# Altium PCB Thunderscope_Rev5.3.PcbDoc (part 7 of 14)
Units mil, origin at the board's own origin, x right, y up, seen from the top; angles counter-clockwise.
Board outline 3937.01 x 3838.58 mil, 6 copper layers (F.Cu, In1.Cu (GND), In2.Cu (Sign), In3.Cu (Sign), In4.Cu (GND), B.Cu), stack 60.556 mil thick; 911 components, 486 nets, 2834 pads, 2761 vias.
Unrouted connection lines stored in the file: 618.
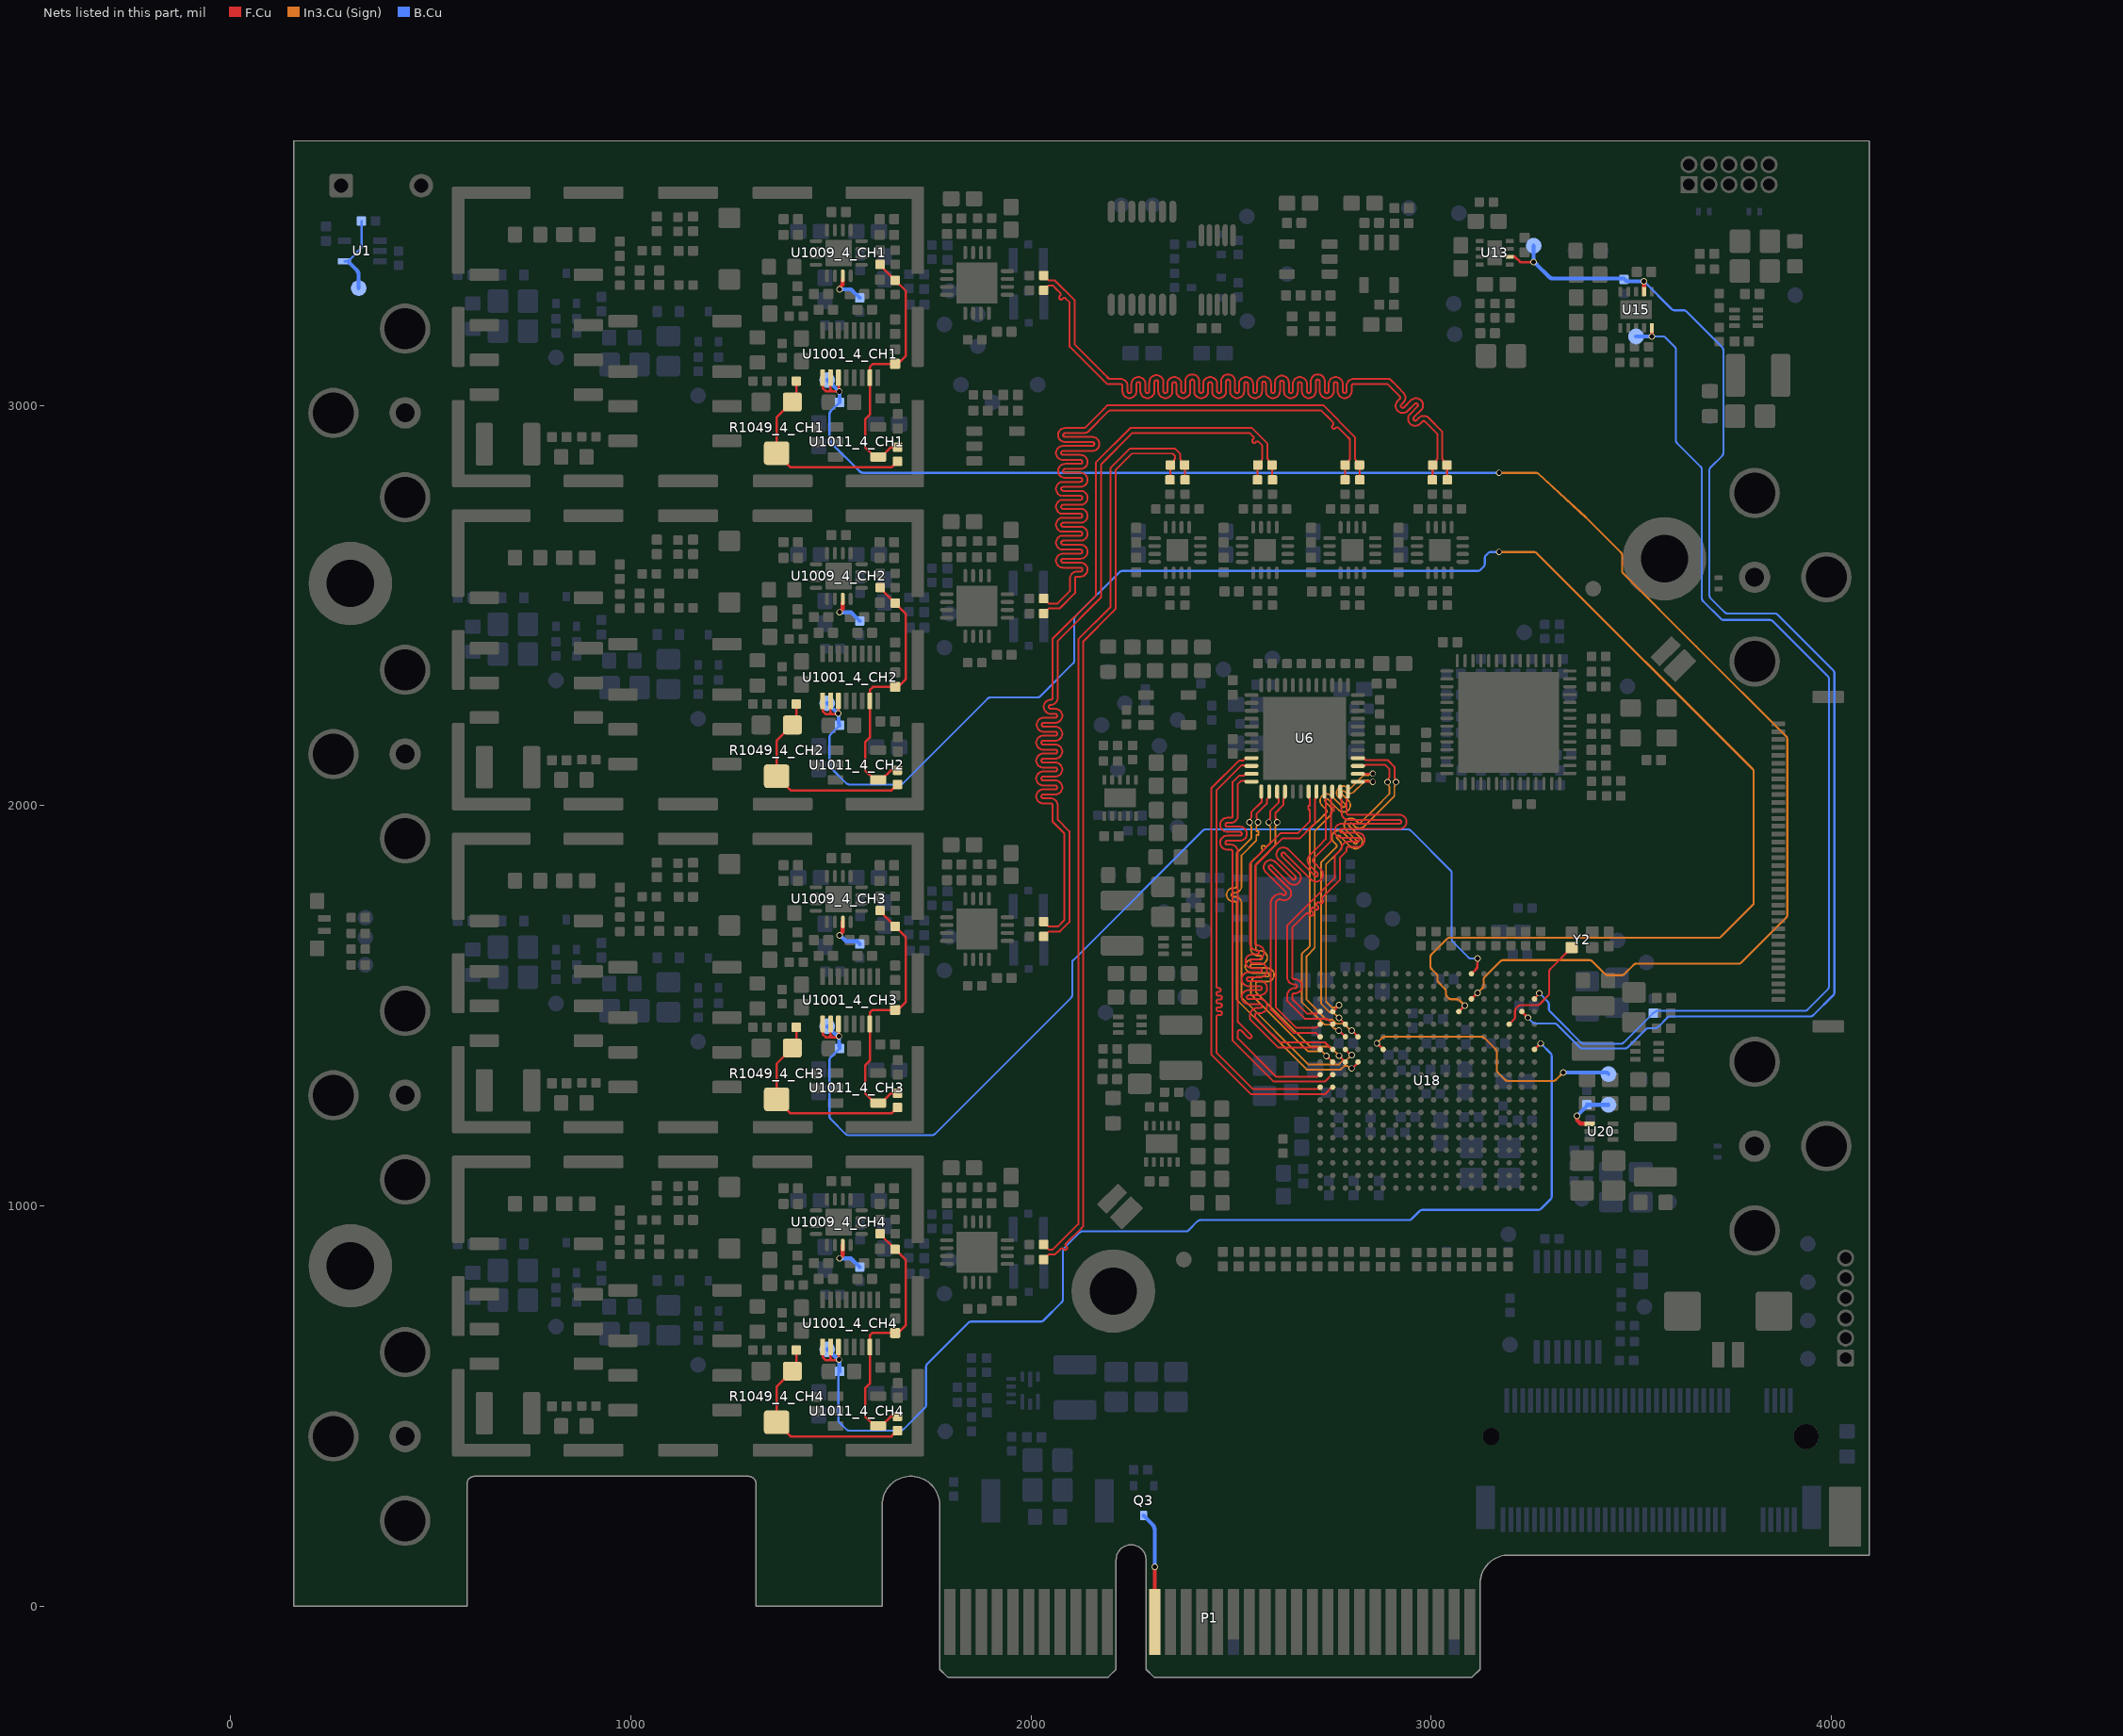
[diagram p10: the nets of this part, all layers, seen from the top]

## Via types
v1: diameter 16, hole 11.81, F.Cu to B.Cu, tented both sides, 2761 vias

## Nets (pads, with @x,y where several pads share a name; then routed paths per layer and width w, separated by ;. In a path a pad name is that pad's centre, name@x,y a point inside that pad or via, vN(x,y) a via of type N, cw(c..) or ccw(c..) an arc to the next point about the centre after c; other vN are vias at no path point) (continued)
BUF_R_BIAS_CH1: R1036_4_CH1.1 U1009_4_CH1.7 | length 85.2
  F.Cu w10: v1(1521.59,3290.42) 1522.73,3291.57 1522.73,3295.87 1529.53,3302.66 U1009_4_CH1.7@1529.53,3313.07
  B.Cu w10: v1(1521.59,3290.42) 1550.13,3290.42 R1036_4_CH1.1@1571.85,3268.7
BUF_R_BIAS_CH2: R1036_4_CH2.1 U1009_4_CH2.7 | length 85.2
  F.Cu w10: v1(1521.59,2483.34) 1521.59,2484.31 1529.47,2492.19 U1009_4_CH2.7@1529.47,2505.98
  B.Cu w10: v1(1521.59,2483.34) 1550.13,2483.34 R1036_4_CH2.1@1571.85,2461.61
BUF_R_BIAS_CH3: R1036_4_CH3.1 U1009_4_CH3.7 | length 95.9
  F.Cu w10: v1(1521.59,1676.25) 1521.59,1677.17 1529.53,1685.11 U1009_4_CH3.7@1529.53,1709.65
  B.Cu w10: v1(1521.59,1676.25) 1523.21,1676.25 1538.12,1661.34 1565.04,1661.34 R1036_4_CH3.1@1571.85,1654.53
BUF_R_BIAS_CH4: R1036_4_CH4.1 U1009_4_CH4.7 | length 95.9
  F.Cu w10: v1(1521.59,869.16) 1529.53,877.1 U1009_4_CH4.7@1529.53,902.56
  B.Cu w10: v1(1521.59,869.16) 1550.13,869.16 R1036_4_CH4.1@1571.85,847.44
CH1_N: "R131_4_ADC Driver 1.1" "R133_4_ADC Driver 1.1" R97_4_CH1.2 | length 2300.6
  F.Cu w4.7: R97_4_CH1.2@2031.5,3287.4 2031.82,3287.4 2044.17,3299.75 2054.25,3299.75 2064.36,3289.64 2072.88,3281.12 cw(c2069.45,3277.69) 2072.88,3274.26 2071.56,3272.94 ccw(c2074.99,3269.51) 2071.56,3266.08 ccw(c2074.99,3269.51) 2078.42,3266.08 2079.74,3267.4 cw(c2083.17,3263.97) 2086.6,3267.4 2096.54,3257.46 2096.54,3253.51 2096.54,3146.91 2181.3,3062.15 2189.74,3053.7 2223.6,3053.7 cw(c2223.6,3048.86) 2228.45,3048.86 2228.45,3035.89 ccw(c2246,3035.89) 2246,3018.34 ccw(c2246,3035.89) 2263.55,3035.89 2263.55,3053.71 cw(c2268.4,3053.71) 2268.4,3058.56 cw(c2268.4,3053.71) 2273.25,3053.71 2273.25,3035.89 ccw(c2290.8,3035.89) 2290.8,3018.34 ccw(c2290.8,3035.89) 2308.35,3035.89 2308.35,3058.34 cw(c2313.2,3058.34) 2313.2,3063.19 cw(c2313.2,3058.34) 2318.05,3058.34 2318.05,3035.89 ccw(c2335.6,3035.89) 2335.6,3018.34 ccw(c2335.6,3035.89) 2353.15,3035.89 2353.15,3053.71 cw(c2358,3053.71) 2358,3058.56 cw(c2358,3053.71) 2362.85,3053.71 2362.85,3035.89 ccw(c2380.4,3035.89) 2380.4,3018.34 ccw(c2380.4,3035.89) 2397.95,3035.89 2397.95,3060.04 cw(c2402.8,3060.04) 2402.8,3064.89 cw(c2402.8,3060.04) 2407.65,3060.04 2407.65,3035.89 ccw(c2425.2,3035.89) 2425.2,3018.34 ccw(c2425.2,3035.89) 2442.75,3035.89 2442.75,3053.71 cw(c2447.6,3053.71) 2447.6,3058.56 cw(c2447.6,3053.71) 2452.45,3053.71 2452.45,3035.89 ccw(c2470,3035.89) 2470,3018.34 ccw(c2470,3035.89) 2487.55,3035.89 2487.55,3060.04 cw(c2492.4,3060.04) 2492.4,3064.89 cw(c2492.4,3060.04) 2497.25,3060.04 2497.25,3035.89 ccw(c2514.8,3035.89) 2514.8,3018.34 ccw(c2514.8,3035.89) 2532.35,3035.89 2532.35,3053.71 cw(c2537.2,3053.71) 2537.2,3058.56 cw(c2537.2,3053.71) 2542.05,3053.71 2542.05,3035.89 ccw(c2559.6,3035.89) 2559.6,3018.34 ccw(c2559.6,3035.89) 2577.15,3035.89 2577.15,3054.88 cw(c2582,3054.88) 2582,3059.73 cw(c2582,3054.88) 2586.85,3054.88 2586.85,3035.89 ccw(c2604.4,3035.89) 2604.4,3018.34 ccw(c2604.4,3035.89) 2621.95,3035.89 2621.95,3056.98 cw(c2626.8,3056.98) 2626.8,3061.83 cw(c2626.8,3056.98) 2631.65,3056.98 2631.65,3035.89 ccw(c2649.2,3035.89) 2649.2,3018.34 ccw(c2649.2,3035.89) 2666.75,3035.89 2666.75,3053.71 cw(c2671.6,3053.71) 2671.6,3058.56 cw(c2671.6,3053.71) 2676.45,3053.71 2676.45,3035.89 ccw(c2694,3035.89) 2694,3018.34 ccw(c2694,3035.89) 2711.55,3035.89 2711.55,3060.04 cw(c2716.4,3060.04) 2716.4,3064.89 cw(c2716.4,3060.04) 2721.25,3060.04 2721.25,3035.89 ccw(c2738.8,3035.89) 2738.8,3018.34 ccw(c2738.8,3035.89) 2756.35,3035.89 2756.35,3053.71 cw(c2761.2,3053.71) 2761.2,3058.56 cw(c2761.2,3053.71) 2766.05,3053.71 2766.05,3035.89 ccw(c2783.6,3035.89) 2783.6,3018.34 ccw(c2783.6,3035.89) 2801.15,3035.89 2801.15,3048.86 cw(c2805.99,3048.86) 2805.99,3053.7 2847.72,3053.7 2890.61,3053.7 2906.66,3037.66 2921.19,3023.13 ; 2921.2,3023.11 cw(c2917.79,3019.66) 2921.22,3016.23 2916.22,3011.24 ccw(c2928.63,2998.83) 2916.22,2986.42 ccw(c2928.63,2998.83) 2941.04,2986.42 2958.58,3003.95 cw(c2962.01,3000.52) 2965.44,3003.95 cw(c2962.01,3000.52) 2965.46,2997.12 2947.43,2979.08 ccw(c2959.84,2966.67) 2947.43,2954.26 ccw(c2959.84,2966.67) 2972.26,2954.28 2977.72,2959.74 cw(c2981.15,2956.31) 2984.6,2959.72 3015.18,2929.14 3015.18,2898.84 3015.18,2866.35 3012.9,2864.07 3012.9,2860.47 3003.81,2851.38 3003.32,2850.89
  F.Cu w5: 3002.83,2813.98 3003.32,2814.47 3003.32,2850.89
CH1_P: "R131_4_ADC Driver 1.2" "R132_4_ADC Driver 1.1" R52_4_CH1.2 | length 2307.2
  F.Cu w4.7: R52_4_CH1.2@2031.5,3324.8 2031.82,3324.8 2044.17,3312.45 2059.51,3312.45 2109.24,3262.72 2109.24,3152.17 2181.47,3079.94 2195,3066.4 2223.6,3066.4 cw(c2223.6,3048.86) 2241.15,3048.86 2241.15,3035.89 ccw(c2246,3035.89) 2246,3031.04 ccw(c2246,3035.89) 2250.85,3035.89 2250.85,3053.71 cw(c2268.4,3053.71) 2268.4,3071.26 cw(c2268.4,3053.71) 2285.95,3053.71 2285.95,3035.89 ccw(c2290.8,3035.89) 2290.8,3031.04 ccw(c2290.8,3035.89) 2295.65,3035.89 2295.65,3058.34 cw(c2313.2,3058.34) 2313.2,3075.89 cw(c2313.2,3058.34) 2330.75,3058.34 2330.75,3035.89 ccw(c2335.6,3035.89) 2335.6,3031.04 ccw(c2335.6,3035.89) 2340.45,3035.89 2340.45,3053.71 cw(c2358,3053.71) 2358,3071.26 cw(c2358,3053.71) 2375.55,3053.71 2375.55,3035.89 ccw(c2380.4,3035.89) 2380.4,3031.04 ccw(c2380.4,3035.89) 2385.25,3035.89 2385.25,3060.04 cw(c2402.8,3060.04) 2402.8,3077.59 cw(c2402.8,3060.04) 2420.35,3060.04 2420.35,3035.89 ccw(c2425.2,3035.89) 2425.2,3031.04 ccw(c2425.2,3035.89) 2430.05,3035.89 2430.05,3053.71 cw(c2447.6,3053.71) 2447.6,3071.26 cw(c2447.6,3053.71) 2465.15,3053.71 2465.15,3035.89 ccw(c2470,3035.89) 2470,3031.04 ccw(c2470,3035.89) 2474.85,3035.89 2474.85,3060.04 cw(c2492.4,3060.04) 2492.4,3077.59 cw(c2492.4,3060.04) 2509.95,3060.04 2509.95,3035.89 ccw(c2514.8,3035.89) 2514.8,3031.04 ccw(c2514.8,3035.89) 2519.65,3035.89 2519.65,3053.71 cw(c2537.2,3053.71) 2537.2,3071.26 cw(c2537.2,3053.71) 2554.75,3053.71 2554.75,3035.89 ccw(c2559.6,3035.89) 2559.6,3031.04 ccw(c2559.6,3035.89) 2564.45,3035.89 2564.45,3054.88 cw(c2582,3054.88) 2582,3072.43 cw(c2582,3054.88) 2599.55,3054.88 2599.55,3035.89 ccw(c2604.4,3035.89) 2604.4,3031.04 ccw(c2604.4,3035.89) 2609.25,3035.89 2609.25,3056.98 cw(c2626.8,3056.98) 2626.8,3074.53 cw(c2626.8,3056.98) 2644.35,3056.98 2644.35,3035.89 ccw(c2649.2,3035.89) 2649.2,3031.04 ccw(c2649.2,3035.89) 2654.05,3035.89 2654.05,3053.71 cw(c2671.6,3053.71) 2671.6,3071.26 cw(c2671.6,3053.71) 2689.15,3053.71 2689.15,3035.89 ccw(c2694,3035.89) 2694,3031.04 ccw(c2694,3035.89) 2698.85,3035.89 2698.85,3060.04 cw(c2716.4,3060.04) 2716.4,3077.59 cw(c2716.4,3060.04) 2733.95,3060.04 2733.95,3035.89 ccw(c2738.8,3035.89) 2738.8,3031.04 ccw(c2738.8,3035.89) 2743.65,3035.89 2743.65,3053.71 cw(c2761.2,3053.71) 2761.2,3071.26 cw(c2761.2,3053.71) 2778.75,3053.71 2778.75,3035.89 ccw(c2783.6,3035.89) 2783.6,3031.04 ccw(c2783.6,3035.89) 2788.45,3035.89 2788.45,3048.86 cw(c2805.99,3048.86) 2805.99,3066.4 2847.72,3066.4 2895.87,3066.4 2915.64,3046.64 2930.2,3032.07 ; 2930.22,3032.05 2932.06,3030.21 2932.06,3029.88 cw(c2917.79,3019.66) 2930.2,3007.25 2925.2,3002.26 ccw(c2928.63,2998.83) 2925.2,2995.4 ccw(c2928.63,2998.83) 2932.06,2995.4 2949.6,3012.93 cw(c2962.01,3000.52) 2974.42,3012.93 cw(c2962.01,3000.52) 2974.4,2988.1 ; 2974.38,2988.08 2956.41,2970.1 ccw(c2959.84,2966.67) 2956.41,2963.24 ccw(c2959.84,2966.67) 2963.24,2963.22 2968.74,2968.72 cw(c2981.15,2956.31) 2991.36,2970.58 2991.7,2970.58 2993.53,2968.74 ; 2993.56,2968.72 3027.88,2934.4 3027.88,2911.54 3027.88,2866.35 3030.16,2864.07 3030.16,2860.05 3030.31,2859.9
  F.Cu w5: 3030.39,2859.98 3039,2851.38 3039.24,2851.38 3039.74,2850.89 3039.74,2814.47 3040.23,2813.98
CH2_N: "R131_4_ADC Driver 2.1" "R133_4_ADC Driver 2.1" R97_4_CH2.2 | length 2300.2
  F.Cu w4.7: R97_4_CH2.2@2031.5,2480.32 2031.82,2480.32 2044.17,2492.67 2071.41,2492.67 2109.87,2531.13 2109.87,2533.76 2109.87,2567.65 cw(c2114.72,2567.65) 2114.72,2572.5 2123.34,2572.5 ccw(c2123.34,2590.05) 2123.34,2607.6 2079.92,2607.6 cw(c2079.92,2612.45) 2079.92,2617.3 2123.65,2617.3 ccw(c2123.65,2634.85) 2123.65,2652.4 2079.92,2652.4 cw(c2079.92,2657.25) 2079.92,2662.1 2123.65,2662.1 ccw(c2123.65,2679.65) 2123.65,2697.2 2079.92,2697.2 cw(c2079.92,2702.05) 2079.92,2706.9 2123.65,2706.9 ccw(c2123.65,2724.45) 2123.65,2742 2079.92,2742 cw(c2079.92,2746.85) 2079.92,2751.7 2123.65,2751.7 ccw(c2123.65,2769.25) 2123.65,2786.8 2079.92,2786.8 cw(c2079.92,2791.65) 2079.92,2796.5 2123.65,2796.5 ccw(c2123.65,2814.05) 2123.65,2831.6 2085.07,2831.6 cw(c2085.07,2836.45) 2085.07,2841.3 2123.65,2841.3 ccw(c2123.65,2858.85) 2123.65,2876.4 2079.92,2876.4 cw(c2079.92,2881.25) 2079.92,2886.1 2153.26,2886.1 ccw(c2153.26,2903.65) 2153.26,2921.2 2085.07,2921.2 cw(c2085.07,2926.05) 2085.07,2930.9 2132,2930.9 ccw(c2132,2948.45) 2144.41,2936.04 2193.75,2985.38 2193.79,2985.42 2193.79,2985.47 2196.35,2988.03 2196.35,2988.08 ; 2784.81,2850.89 2785.3,2851.38 2794.39,2860.47 2794.39,2864.07 2796.67,2866.35 2796.67,2915.79 2785.96,2926.51 2768.21,2944.25 ccw(c2764.78,2940.82) 2761.35,2944.25 2760.27,2943.17 cw(c2756.84,2946.6) 2753.41,2943.17 cw(c2756.84,2946.6) 2753.41,2950.03 2754.5,2951.11 ccw(c2751.07,2954.54) 2754.5,2957.97 2745.97,2966.49 2724.35,2988.12 2198.77,2988.12 2196.38,2988.12 ; 2196.35,2988.08 2196.38,2988.12
  F.Cu w5: 2784.32,2813.98 2784.81,2814.47 2784.81,2850.89
CH2_P: "R131_4_ADC Driver 2.2" "R132_4_ADC Driver 2.1" R52_4_CH2.2 | length 2306.8
  F.Cu w4.7: R52_4_CH2.2@2031.5,2517.72 2031.82,2517.72 2044.17,2505.37 2066.15,2505.37 2094.54,2533.76 2097.17,2536.39 2097.17,2567.65 cw(c2114.72,2567.65) 2114.72,2585.2 2123.34,2585.2 ccw(c2123.34,2590.05) 2123.34,2594.9 2079.92,2594.9 cw(c2079.92,2612.45) 2079.92,2630 2123.65,2630 ccw(c2123.65,2634.85) 2123.65,2639.7 2079.92,2639.7 cw(c2079.92,2657.25) 2079.92,2674.8 2123.65,2674.8 ccw(c2123.65,2679.65) 2123.65,2684.5 2079.92,2684.5 cw(c2079.92,2702.05) 2079.92,2719.6 2123.65,2719.6 ccw(c2123.65,2724.45) 2123.65,2729.3 2079.92,2729.3 cw(c2079.92,2746.85) 2079.92,2764.4 2123.65,2764.4 ccw(c2123.65,2769.25) 2123.65,2774.1 2079.92,2774.1 cw(c2079.92,2791.65) 2079.92,2809.2 2123.65,2809.2 ccw(c2123.65,2814.05) 2123.65,2818.9 2085.07,2818.9 cw(c2085.07,2836.45) 2085.07,2854 2123.65,2854 ccw(c2123.65,2858.85) 2123.65,2863.7 2079.92,2863.7 cw(c2079.92,2881.25) 2079.92,2898.8 2153.26,2898.8 ccw(c2153.26,2903.65) 2153.26,2908.5 2085.07,2908.5 cw(c2085.07,2926.05) 2085.07,2943.6 2132,2943.6 ccw(c2132,2948.45) 2135.43,2945.02 2181.05,2990.64 2181.09,2990.68 2181.09,2990.73 ; 2181.05,2990.75 2191.12,3000.82 2729.61,3000.82 2809.37,2921.05 2809.37,2866.35 2811.65,2864.07 2811.65,2860.05 2811.8,2859.9
  F.Cu w5: 2811.89,2859.98 2820.49,2851.38 2820.74,2851.38 2821.23,2850.89 2821.23,2814.47 2821.72,2813.98
CH3_N: "R131_4_ADC Driver 3.1" "R133_4_ADC Driver 3.1" R97_4_CH3.2 | length 2283.9
  F.Cu w4.7: R97_4_CH3.2@2031.5,1673.23 2031.82,1673.23 2044.17,1685.58 2072.12,1685.58 2095.88,1709.34 2095.88,1935.91 2066.79,1965 2066.79,1992.13 2066.79,2000.83 ccw(c2049.24,2000.83) 2049.24,2018.38 2030.59,2018.38 cw(c2030.59,2023.23) 2030.59,2028.08 2060.51,2028.08 ccw(c2060.51,2045.63) 2060.51,2063.18 2030.59,2063.18 cw(c2030.59,2068.03) 2030.59,2072.88 2060.51,2072.88 ccw(c2060.51,2090.43) 2060.51,2107.98 2030.59,2107.98 cw(c2030.59,2112.83) 2030.59,2117.68 2060.51,2117.68 ccw(c2060.51,2135.23) 2060.51,2152.78 2030.59,2152.78 cw(c2030.59,2157.63) 2030.59,2162.48 2060.51,2162.48 ccw(c2060.51,2180.03) 2060.51,2197.58 2031.7,2197.58 cw(c2031.7,2202.43) 2031.7,2207.28 2060.44,2207.28 ccw(c2060.44,2224.83) 2060.44,2242.38 2049.24,2242.38 cw(c2049.24,2247.23) 2049.24,2252.08 ccw(c2049.24,2269.63) 2066.79,2269.63 2066.79,2317.1 2066.79,2412.47 2175.02,2520.7 2175.02,2852.92 2253.3,2931.2 2546.6,2931.2 2555.13,2922.68 cw(c2551.7,2919.25) 2555.13,2915.82 2553.94,2914.63 ccw(c2557.37,2911.2) 2553.94,2907.77 ccw(c2557.37,2911.2) 2560.8,2907.77 2561.98,2908.96 cw(c2565.41,2905.53) 2568.84,2908.96 2578.16,2899.64 2578.16,2866.35 2575.89,2864.07 2575.89,2860.47 2566.8,2851.38 2566.31,2850.89
  F.Cu w5: 2565.81,2813.98 2566.31,2814.47 2566.31,2850.89
CH3_P: "R131_4_ADC Driver 3.2" "R132_4_ADC Driver 3.1" R52_4_CH3.2 | length 2290.5
  F.Cu w4.7: R52_4_CH3.2@2031.5,1710.63 2031.82,1710.63 2044.17,1698.28 2066.86,1698.28 2083.18,1714.6 2083.18,1930.65 2054.09,1959.74 2054.09,1992.13 2054.09,2000.83 ccw(c2049.24,2000.83) 2049.24,2005.68 2030.59,2005.68 cw(c2030.59,2023.23) 2030.59,2040.78 2060.51,2040.78 ccw(c2060.51,2045.63) 2060.51,2050.48 2030.59,2050.48 cw(c2030.59,2068.03) 2030.59,2085.58 2060.51,2085.58 ccw(c2060.51,2090.43) 2060.51,2095.28 2030.59,2095.28 cw(c2030.59,2112.83) 2030.59,2130.38 2060.51,2130.38 ccw(c2060.51,2135.23) 2060.51,2140.08 2030.59,2140.08 cw(c2030.59,2157.63) 2030.59,2175.18 2060.51,2175.18 ccw(c2060.51,2180.03) 2060.51,2184.88 2031.7,2184.88 cw(c2031.7,2202.43) 2031.7,2219.98 2060.44,2219.98 ccw(c2060.44,2224.83) 2060.44,2229.68 2049.24,2229.68 cw(c2049.24,2247.23) 2049.24,2264.78 ccw(c2049.24,2269.63) 2054.09,2269.63 2054.09,2317.1 2054.09,2417.73 2162.32,2525.96 2162.32,2858.18 2248.04,2943.9 2551.87,2943.9 2590.86,2904.9 2590.86,2866.35 2593.14,2864.07 2593.14,2860.47 2602.23,2851.38
  F.Cu w5: 2602.23,2851.38 2602.72,2850.89 2602.72,2814.47 2603.21,2813.98
CH4_N: "R131_4_ADC Driver 4.1" "R133_4_ADC Driver 4.1" R97_4_CH4.2 | length 2303.9
  F.Cu w4.7: R97_4_CH4.2@2031.5,866.14 2031.82,866.14 2044.17,878.49 2059.56,878.49 2065.25,884.18 2066.91,885.84 2073.77,892.7 cw(c2077.2,889.27) 2080.63,892.7 2081.82,891.51 ccw(c2085.25,894.94) 2088.68,891.51 ccw(c2085.25,894.94) 2088.68,898.37 2087.49,899.56 cw(c2090.92,902.99) 2087.49,906.42 2125.71,944.64 2127.37,946.3 2130.65,949.58 2130.65,2410.66 2203.98,2483.98 2211.42,2491.42 2211.42,2839.06 2252.21,2879.85 2353.94,2879.85 2359.66,2874.13 2359.66,2866.35 2357.38,2864.07 2357.38,2860.47 2348.29,2851.38
  F.Cu w5: 2347.31,2813.98 2347.8,2814.47 2347.8,2850.89 2348.29,2851.38
CH4_P: "R131_4_ADC Driver 4.2" "R132_4_ADC Driver 4.1" R52_4_CH4.2 | length 2310.5
  F.Cu w4.7: R52_4_CH4.2@2031.5,903.54 2031.82,903.54 2044.17,891.19 2054.3,891.19 2117.95,954.84 2117.95,2415.92 2198.72,2496.68 2198.72,2844.32 2246.94,2892.55 2359.2,2892.55 2372.36,2879.39 2372.36,2866.35 2374.64,2864.07 2374.64,2860.47 2383.72,2851.38
  F.Cu w5: 2383.72,2851.38 2384.22,2850.89 2384.22,2814.47 2384.71,2813.98
CLK25: U18.T14 Y2.3 | length 282.3
  F.Cu w5: U18.T14@3194.94,1454.1 3206.45,1465.61 ccw(c3199.37,1472.67) 3209.37,1472.67 3209.37,1487.43 cw(c3219.37,1487.43) 3212.3,1494.5 3216.3,1498.5 cw(c3223.38,1491.44) 3223.38,1501.44 3263.89,1501.44 ccw(c3263.89,1511.44) 3270.94,1504.35 3291.84,1525.25 ccw(c3284.75,1532.3) 3294.75,1532.3 3294.75,1585.13 cw(c3304.75,1585.13) 3297.66,1592.18 Y2.3@3351.15,1645.67
CLKREQ#: P1.B12 Q3.1 | length 276.3
  F.Cu w10: P1.B12@2309.06,-39.37 v1(2309.06,98.43)
  B.Cu w10: Q3.1@2281.5,226.38 2285.75,222.13 2303.23,204.64 cw(c2289.06,190.53) 2309.06,190.53 v1(2309.06,98.43)
COMP: R7.2 TP61.1 U1.4 | length 199.7
  B.Cu w6: U1.4@284.45,3360.24 288.39,3360.24 293.31,3360.24 323.28,3390.21 ccw(c314.77,3398.67) 326.77,3398.67 R7.2@326.77,3460.63
  B.Cu w10: U1.4@293.31,3360.24 296.18,3357.36 314.02,3339.52 cw(c299.88,3325.38) 319.88,3325.38 TP61.1@319.88,3293.31
D1A_N: U6.10 U18.A9 | length 1142
  F.Cu w4.7: U6.10@2550.91,2099.41 2549.92,2100.39 2533.49,2100.39 2533.21,2100.68 2525.42,2100.68 2462.94,2038.2 2462.94,1579.84 2462.94,1549.65 ccw(c2467.79,1549.65) 2467.79,1544.8 2469.08,1544.8 cw(c2469.08,1539.95) 2469.08,1535.1 2467.79,1535.1 ccw(c2467.79,1530.25) 2467.79,1525.4 2472.26,1525.4 cw(c2472.26,1520.55) 2472.26,1515.7 2467.79,1515.7 ccw(c2467.79,1510.85) 2467.79,1506 2472.26,1506 cw(c2472.26,1501.15) 2472.26,1496.3 2467.79,1496.3 ccw(c2467.79,1491.45) 2467.79,1486.6 2472.26,1486.6 cw(c2472.26,1481.75) 2472.26,1476.9 2467.79,1476.9 ccw(c2467.79,1472.05) 2462.94,1472.05 2462.94,1460 2462.94,1383.8 2554.82,1291.92 2715.15,1291.92 2719.98,1296.75 U18.A9@2722.44,1296.75
D1A_P: U6.9 U18.B9 | length 1149
  F.Cu w4.7: U6.9@2550.91,2119.09 2536.72,2119.09 2531,2113.38 2520.16,2113.38 2450.24,2043.46 2450.24,1378.54 2549.56,1279.22 2734.25,1279.22 2751.79,1296.75 U18.B9@2753.94,1296.75
D1B_N: U6.12 U18.A10 | length 1126.9
  F.Cu w4.7: U6.12@2550.91,2060.04 2549.92,2061.02 2533.49,2061.02 2532.48,2062.04 2524.69,2062.04 2516.75,2054.09 2516.75,2005.92 2516.75,1974.82 cw(c2499.2,1974.82) 2499.2,1957.27 2490.19,1957.27 ccw(c2490.19,1952.42) 2490.19,1947.57 2521.83,1947.57 cw(c2521.83,1930.02) 2521.83,1912.47 2490.19,1912.47 ccw(c2490.19,1907.62) 2490.19,1902.77 2499.2,1902.77 cw(c2499.2,1885.22) 2516.75,1885.22 2516.75,1775.81 2516.75,1478.25 2516.75,1462.23 ccw(c2521.6,1462.23) 2518.17,1458.8 2549.91,1427.06 cw(c2546.48,1423.63) 2549.91,1420.2 cw(c2546.48,1423.63) 2543.05,1420.2 2525.03,1438.22 ccw(c2521.6,1434.8) 2516.75,1434.8 2516.75,1426.03 2516.75,1418.4 2611.73,1323.42 2715.15,1323.42 2719.98,1328.25 U18.A10@2722.44,1328.25
D1B_P: U6.11 U18.B10 | length 1133.5
  F.Cu w4.7: U6.11@2550.91,2079.72 2536.72,2079.72 2531.73,2074.74 2519.43,2074.74 2504.05,2059.35 2504.05,2005.92 2504.05,1974.82 cw(c2499.2,1974.82) 2499.2,1969.97 2490.19,1969.97 ccw(c2490.19,1952.42) 2490.19,1934.87 2521.83,1934.87 cw(c2521.83,1930.02) 2521.83,1925.17 2490.19,1925.17 ccw(c2490.19,1907.62) 2490.19,1890.07 2499.2,1890.07 cw(c2499.2,1885.22) 2504.05,1885.22 2504.05,1775.81 2504.05,1413.14 2606.47,1310.72 2734.25,1310.72 2751.79,1328.25 U18.B10@2753.94,1328.25
D2A_N: U6.14 U18.C12 | length 965.5
  F.Cu w4.7: v1(2567.2,1958.86) 2565.04,1961.02 2565.04,1967.96 2562.99,1970.02 2562.99,1978.75 2589.2,2004.97 2589.2,2015.25 2595.2,2021.25 U6.14@2595.2,2035.43
  F.Cu w5: U18.C12@2785.49,1391.1 2785.49,1390.61 2799.27,1376.83 v1(2801.24,1376.83)
  In3.Cu (Sign) w4.3: v1(2567.2,1958.86) 2564.96,1956.62 2564.96,1950.15 2562.79,1947.97 2562.79,1936.48 2568.05,1936.48 2568.05,1927.18 2562.79,1927.18 2562.79,1915.73 2562.79,1912.93 2525.91,1876.05 2525.91,1829.08 2525.91,1799.18 cw(c2508.96,1799.18) 2508.96,1782.23 2505.42,1782.23 ccw(c2505.42,1777.58) 2505.42,1772.93 2508.96,1772.93 cw(c2508.96,1755.98) 2525.91,1755.98 2525.91,1698.59 2525.91,1521.03 2693.76,1353.17 2768.88,1353.17 2777.74,1362.03 2786.03,1362.03 2800.83,1376.83 v1(2801.24,1376.83)
D2A_P: U6.13 U18.D11 | length 967.2
  F.Cu w4.7: v1(2546.07,1958.86) 2548.24,1961.02 2548.24,1967.96 2550.29,1970.02 2550.29,1984.01 2576.5,2010.23 2576.5,2018.01 2576.5,2034.45 U6.13@2575.51,2035.43
  F.Cu w5: v1@2803.99,1345.14 2816.99,1358.13 U18.D11@2816.99,1359.61
  In3.Cu (Sign) w4.3: v1(2546.07,1958.86) 2548.31,1956.62 2548.31,1950.15 2550.49,1947.97 2550.49,1918.03 2513.61,1881.14 2513.61,1829.08 2513.61,1799.18 cw(c2508.96,1799.18) 2508.96,1794.53 2505.42,1794.53 ccw(c2505.42,1777.58) 2505.42,1760.63 2508.96,1760.63 cw(c2508.96,1755.98) 2513.61,1755.98 2513.61,1698.59 2513.61,1515.93 2688.67,1340.87 2773.98,1340.87 2782.83,1349.73 2791.52,1349.73 2797.68,1343.57 v1(2800.84,1343.57)
D2B_N: U6.16 U18.C11 | length 970.9
  F.Cu w4.7: v1(2614.89,1958.86) 2612.73,1961.02 2612.73,1967.96 2610.68,1970.02 2610.68,1982.07 2631.08,2002.46 2631.08,2017.75 2634.57,2021.25 U6.16@2634.57,2035.43
  F.Cu w5: v1(2769.74,1375.46) 2769.74,1374.86 2785,1359.61 U18.C11@2785.49,1359.61
  In3.Cu (Sign) w4.3: v1(2614.89,1958.86) 2612.66,1956.62 2612.66,1950.15 2610.48,1947.97 2610.48,1901.82 2561.6,1852.94 2561.6,1787.2 2561.6,1642.34 ccw(c2566.25,1642.34) 2566.25,1637.69 2573.15,1637.69 cw(c2573.15,1620.74) 2590.1,1620.74 cw(c2573.15,1620.74) 2573.15,1603.79 2552.16,1603.79 ccw(c2552.16,1599.14) 2547.51,1599.14 ccw(c2552.16,1599.14) 2552.16,1594.49 2590.29,1594.49 cw(c2590.29,1577.54) 2607.24,1577.54 cw(c2590.29,1577.54) 2590.29,1560.59 2566.25,1560.59 ccw(c2566.25,1555.94) 2561.6,1555.94 2561.6,1534.09 2569.66,1526.04 2697.26,1398.44 2746.76,1398.44 v1(2769.74,1375.46)
D2B_P: U6.15 U18.B11 | length 964.7
  F.Cu w4.7: v1(2593.77,1958.09) 2595.93,1960.25 2595.93,1967.2 2597.98,1969.25 2597.98,1987.33 2618.38,2007.72 2618.38,2017.75 2614.88,2021.25 U6.15@2614.88,2035.43
  F.Cu w5: v1(2738.24,1374.86) U18.B11@2753.5,1359.61
  In3.Cu (Sign) w4.3: v1(2593.77,1958.09) 2596.01,1955.85 2596.01,1949.38 2598.18,1947.2 2598.18,1906.91 2590.27,1899 cw(c2586.98,1902.29) 2583.69,1899 2583.63,1899.07 ccw(c2580.34,1895.78) 2577.05,1899.07 ccw(c2580.34,1895.78) 2577.05,1892.49 2577.12,1892.43 cw(c2573.83,1889.14) 2577.12,1885.85 2575.6,1884.33 2549.3,1858.04 2549.3,1787.2 2549.3,1642.34 ccw(c2566.25,1642.34) 2566.25,1625.39 2573.15,1625.39 cw(c2573.15,1620.74) 2577.8,1620.74 cw(c2573.15,1620.74) 2573.15,1616.09 2552.16,1616.09 ccw(c2552.16,1599.14) 2535.21,1599.14 ccw(c2552.16,1599.14) 2552.16,1582.19 2590.29,1582.19 cw(c2590.29,1577.54) 2594.94,1577.54 cw(c2590.29,1577.54) 2590.29,1572.89 2566.25,1572.89 ccw(c2566.25,1555.94) 2549.3,1555.94 2549.3,1529 2552.26,1526.04 2692.16,1386.14 2727.1,1386.14 ; 2727.36,1386.14 2738.24,1375.25 v1(2738.24,1374.86)
D3A_N: U6.22 U18.A14 | length 1125.7
  F.Cu w4.7: 2602.18,1849.95 ccw(c2598.73,1846.54) 2595.3,1849.97 ccw(c2598.73,1846.54) 2595.28,1843.13 2644.76,1793.65 ; 2602.19,1849.94 2644.35,1807.78 ; 2633.87,1881.62 2699.83,1815.65 ccw(c2712.24,1828.06) 2724.65,1815.65 ccw(c2712.24,1828.06) 2724.65,1840.47 2705.02,1860.11 cw(c2708.45,1863.54) 2705.02,1866.97 2726.89,1888.84 2749.19,1911.13 2749.19,1974.68 2749.19,1986.73 2756.25,1986.73 2756.25,1996.43 2749.19,1996.43 2749.19,2003.52 2749.19,2017.75 2752.68,2021.25 U6.22@2752.68,2035.43 ; 2633.86,1881.63 ccw(c2630.41,1878.22) 2626.96,1874.81 2669.2,1832.57 ; 2644.37,1807.76 ccw(c2656.79,1820.16) 2669.2,1807.75 ccw(c2656.79,1820.16) 2671.06,1830.38 2671.06,1830.71 2669.22,1832.55 ; 2644.79,1793.63 2646.62,1791.79 2646.62,1791.46 cw(c2632.35,1781.24) 2644.76,1768.83 cw(c2632.35,1781.24) 2622.27,1766.88 ccw(c2623.88,1754.21) 2612.11,1759.17 2612.11,1680.88 2612.11,1495.5 2662.77,1444.83 2712.39,1444.83 2721.79,1454.23 U18.A14@2722.44,1454.23
D3A_P: U6.21 U18.A13 | length 1132.3
  F.Cu w4.7: 2586.33,1834.12 cw(c2598.73,1846.54) 2586.32,1858.95 cw(c2598.73,1846.54) 2608.95,1860.81 2609.28,1860.81 2611.12,1858.97 ; 2586.36,1834.1 2635.75,1784.7 cw(c2632.35,1781.24) 2635.78,1777.81 cw(c2632.35,1781.24) 2628.94,1777.79 ccw(c2624.43,1773.32) 2624.62,1779.67 ccw(c2623.88,1754.21) 2599.74,1762.34 ccw(c2605.76,1760.32) 2599.41,1760.32 2599.41,1683.09 2599.41,1490.24 2657.51,1432.13 2712.39,1432.13 2721.79,1422.74 U18.A13@2722.44,1422.74 ; 2611.14,1858.95 2653.38,1816.71 ccw(c2656.79,1820.16) 2660.22,1816.73 ccw(c2656.79,1820.16) 2660.2,1823.61 ; 2660.19,1823.62 2618.03,1865.77 cw(c2630.41,1878.22) 2618,1890.63 cw(c2630.41,1878.22) 2640.63,1892.49 2640.96,1892.49 2642.79,1890.65 2661.34,1872.11 2708.82,1824.63 ccw(c2712.24,1828.06) 2715.67,1824.63 ccw(c2712.24,1828.06) 2715.67,1831.49 2696.04,1851.13 cw(c2708.45,1863.54) 2696.04,1875.95 2717.91,1897.82 2736.49,1916.39 2736.49,2017.75 2732.99,2021.25 U6.21@2732.99,2035.43
D3B_N: U6.24 U18.A15 | length 1126.1
  F.Cu w4.7: U18.A15@2722.44,1485.73 2719.98,1485.73 2715.15,1480.9 2689.1,1480.9 2669.06,1500.94 2652.86,1517.14 2652.86,1526.44 cw(c2657.71,1526.44) 2657.71,1531.29 2659.57,1531.29 ccw(c2659.57,1548.84) 2677.12,1548.84 ccw(c2659.57,1548.84) 2659.57,1566.39 2657.71,1566.39 cw(c2657.71,1571.24) 2652.86,1571.24 2652.86,1633.15 2652.86,1695.93 2678.47,1721.53 2686.99,1730.06 cw(c2690.42,1726.63) 2693.85,1730.06 2697.59,1726.31 ccw(c2701.02,1729.74) 2704.45,1726.31 ccw(c2701.02,1729.74) 2704.45,1733.17 2700.7,1736.91 cw(c2704.13,1740.34) 2700.7,1743.77 cw(c2704.13,1740.34) 2707.56,1743.77 2709.84,1741.49 ccw(c2713.27,1744.92) 2716.7,1741.49 ccw(c2713.27,1744.92) 2716.7,1748.35 2714.42,1750.63 cw(c2717.85,1754.06) 2714.42,1757.49 cw(c2717.85,1754.06) 2721.28,1757.49 ccw(c2724.71,1760.92) 2728.14,1757.49 ccw(c2724.71,1760.92) 2728.14,1764.35 cw(c2731.57,1767.78) 2728.14,1771.21 2751.41,1794.48 2768.06,1811.12 2771.77,1814.84 2771.77,1861.56 2771.77,1870.24 2788.56,1887.02 2788.56,1892.66 cw(c2793.41,1892.66) 2793.41,1897.51 2815.91,1897.51 ccw(c2815.91,1915.06) 2815.91,1932.61 2776.44,1932.61 cw(c2776.44,1937.46) 2776.44,1942.31 2920.38,1942.31 ccw(c2920.38,1959.86) 2920.38,1977.41 2793.41,1977.41 cw(c2793.41,1982.26) 2788.56,1982.26 2788.56,2016.92 2788.56,2017.75 2792.05,2021.25 U6.24@2792.05,2035.43
D3B_P: U6.23 U18.B14 | length 1132.2
  F.Cu w4.7: U18.B14@2753.94,1454.23 2739.97,1468.2 2683.84,1468.2 2651.1,1500.94 2640.16,1511.88 2640.16,1526.44 cw(c2657.71,1526.44) 2657.71,1543.99 2659.57,1543.99 ccw(c2659.57,1548.84) 2664.42,1548.84 ccw(c2659.57,1548.84) 2659.57,1553.69 2657.71,1553.69 cw(c2657.71,1571.24) 2640.16,1571.24 2640.16,1633.15 2640.16,1701.19 2759.07,1820.1 2759.07,1861.56 2759.07,1875.5 2775.86,1892.28 2775.86,1892.66 cw(c2793.41,1892.66) 2793.41,1910.21 2815.91,1910.21 ccw(c2815.91,1915.06) 2815.91,1919.91 2776.44,1919.91 cw(c2776.44,1937.46) 2776.44,1955.01 2920.38,1955.01 ccw(c2920.38,1959.86) 2920.38,1964.71 2793.41,1964.71 cw(c2793.41,1982.26) 2775.86,1982.26 2775.86,2016.92 2775.86,2017.75 2772.36,2021.25 U6.23@2772.36,2035.43
D4A_N: U6.26 U18.C13 | length 962.5
  F.Cu w4.7: U6.26@2816.66,2079.72 2817.02,2080.08 2853.49,2080.08 v1(2853.85,2080.44)
  F.Cu w5: v1(2768.95,1438.45) 2769.54,1437.86 2770.73,1437.86 2785.49,1423.09 U18.C13@2785.49,1422.6
  In3.Cu (Sign) w4.3: 2727.22,2000.41 2737.85,1989.77 ; 2727.2,2000.42 cw(c2739.17,2012.42) 2727.18,2024.41 cw(c2739.17,2012.42) 2749.03,2026.21 2749.35,2026.21 2752.93,2022.63 2777.66,1997.91 ccw(c2780.95,2001.19) 2784.23,1997.91 ccw(c2780.95,2001.19) 2784.23,2004.48 2768.42,2020.29 cw(c2780.41,2032.28) 2768.42,2044.26 cw(c2780.41,2032.28) 2792.39,2044.26 ccw(c2795.68,2047.55) 2798.97,2044.26 2820.98,2066.27 2830.74,2076.03 2842.96,2076.03 2845.14,2078.21 2851.61,2078.21 v1(2853.85,2080.44) ; 2737.86,1989.76 cw(c2734.59,1986.46) 2737.88,1983.17 2732.01,1977.3 2696.82,1942.11 2696.82,1649.8 2676.24,1629.23 2676.24,1510.08 2733.51,1452.81 2748.45,1452.81 2758.37,1442.89 2761.35,1442.89 2765.79,1438.45 v1(2768.95,1438.45)
D4A_P: U6.25 U18.D13 | length 958.3
  F.Cu w4.7: U6.25@2816.66,2060.04 2817.02,2059.68 2853.49,2059.68 v1(2853.85,2059.32)
  F.Cu w5: v1(2801.24,1438.45) 2801.63,1438.45 2816.99,1423.09 U18.D13@2816.99,1422.6
  In3.Cu (Sign) w4.3: 2742.48,2015.69 ccw(c2739.17,2012.42) 2735.88,2015.71 ccw(c2739.17,2012.42) 2735.86,2009.16 2748.38,1996.64 2748.38,1996.32 cw(c2734.59,1986.46) 2746.58,1974.47 2740.71,1968.6 2709.12,1937.01 2709.12,1644.7 2688.54,1624.13 2688.54,1515.18 2738.61,1465.11 2753.54,1465.11 2763.47,1455.19 2781.61,1455.19 2798.35,1438.45 v1(2801.24,1438.45) ; 2742.49,2015.68 2768.96,1989.21 ccw(c2780.95,2001.19) 2792.93,1989.21 ccw(c2780.95,2001.19) 2792.93,2013.18 2777.12,2028.99 cw(c2780.41,2032.28) 2777.12,2035.56 cw(c2780.41,2032.28) 2783.7,2035.56 ccw(c2795.68,2047.55) 2807.67,2035.56 2829.68,2057.58 2835.84,2063.73 2842.96,2063.73 2845.14,2061.56 2851.61,2061.56 v1(2853.85,2059.32)
D4B_N: U6.28 U18.B15 | length 966.6
  F.Cu w4.7: U6.28@2816.66,2119.09 2830.84,2119.09 2835.47,2114.46 2890.77,2114.46 2907.92,2097.31 2907.92,2070.21 2909.98,2068.16 2909.98,2061.22 v1(2912.14,2059.06)
  F.Cu w5: U18.B15@2753.99,1485.59 2754.49,1485.59 v1@2769.74,1500.85
  In3.Cu (Sign) w4.3: v1(2769.74,1501.83) 2766.57,1501.83 2760.85,1496.1 2751.73,1496.1 2737.36,1510.47 2737.36,1853.85 2765.47,1881.96 2771.34,1887.83 ccw(c2759.36,1899.82) 2773.14,1909.68 2773.14,1910 2765.34,1917.81 cw(c2768.65,1921.07) 2765.36,1924.36 cw(c2768.65,1921.07) 2771.95,1924.34 2798.82,1897.48 ; 2798.84,1897.46 ccw(c2810.84,1909.43) 2822.82,1897.45 ccw(c2810.84,1909.43) 2824.62,1919.29 2824.62,1919.62 2795.88,1948.36 cw(c2799.2,1951.62) 2795.91,1954.91 cw(c2799.2,1951.62) 2802.5,1954.89 2808.47,1948.93 ccw(c2820.45,1960.91) 2832.44,1948.93 2869.05,1985.54 2907.72,2024.22 2907.72,2048.17 2909.9,2050.34 2909.9,2056.82 v1(2912.14,2059.06)
D4B_P: U6.27 U18.C14 | length 968.9
  F.Cu w4.7: U6.27@2816.66,2099.41 2817.64,2100.39 2834.07,2100.39 2835.44,2101.76 2885.5,2101.76 2895.22,2092.05 2895.22,2070.21 2893.17,2068.16 2893.17,2061.22 v1(2891.01,2059.06)
  F.Cu w5: v1(2769.74,1470.34) 2769.74,1469.84 2785.39,1454.19 U18.C14@2785.49,1454.1
  In3.Cu (Sign) w4.3: 2756.68,1909.07 cw(c2768.65,1921.07) 2756.66,1933.06 cw(c2768.65,1921.07) 2778.51,1934.86 2778.83,1934.86 2807.57,1906.12 ccw(c2810.84,1909.43) 2814.12,1906.15 ccw(c2810.84,1909.43) 2814.11,1912.74 2787.24,1939.61 ; 2756.69,1909.06 2762.61,1903.14 cw(c2759.36,1899.82) 2762.64,1896.53 2756.78,1890.66 2725.06,1858.95 2725.06,1505.38 2746.63,1483.8 2754.98,1483.8 2768.45,1470.34 v1(2769.74,1470.34) ; 2787.23,1939.62 cw(c2799.2,1951.62) 2787.21,1963.61 cw(c2799.2,1951.62) 2809.06,1965.41 2809.38,1965.41 2817.16,1957.62 ccw(c2820.45,1960.91) 2823.74,1957.62 2860.35,1994.24 2895.42,2029.31 2895.42,2048.17 2893.25,2050.34 2893.25,2056.82 v1(2891.01,2059.06)
DC_CPL_1: R1052_4_CH1.1 TP1018_4_CH1.1 U18.N16 U1001_4_CH1.9 U1001_4_CH1.10 U1001_4_CH1.11 | length 4413.2
  F.Cu w6: U1001_4_CH1.9@1479.33,3068.9 1479.33,3043.31 1487.04,3035.6 1494.09,3035.6 ; U1001_4_CH1.10@1499.02,3068.9 1499.02,3040.52 ; U1001_4_CH1.11@1518.7,3068.9 1519.88,3067.72 1519.88,3036.98 v1@1518.5,3035.6 ; v1(1521.05,3035.08) 1520.54,3035.6 v1@1518.5,3035.6 ; U18.N16@3100.59,1517.14 v1(3115.56,1532.12) ; 1494.09,3035.6 1499.02,3035.6 ; 1494.09,3035.6 1499.02,3040.52 ; 1499.02,3035.6 1499.02,3040.52 ; 1499.02,3035.6 1503.94,3035.6 ; 1499.02,3040.52 1503.94,3035.6 ; 1503.94,3035.6 v1@1518.5,3035.6
  In3.Cu (Sign) w5: v1(3115.56,1532.12) 3128.18,1544.74 ccw(c3121.09,1551.8) 3131.09,1551.8 3131.09,1565.49 cw(c3141.09,1565.49) 3134.02,1572.56 3172.72,1611.26 cw(c3179.78,1604.17) 3179.78,1614.17 3395.46,1614.17 cw(c3395.46,1604.17) 3402.52,1611.26 3434.3,1579.48 ccw(c3441.33,1586.59) 3441.33,1576.59 3475.59,1576.59 ccw(c3475.59,1586.59) 3482.65,1579.51 3505.56,1602.42 cw(c3512.6,1595.31) 3512.6,1605.31 3767.9,1605.31 ccw(c3767.9,1615.31) 3774.95,1608.23 3886.76,1720.04 ccw(c3879.67,1727.09) 3889.67,1727.09 3889.67,2166.55 ccw(c3879.67,2166.55) 3886.74,2173.62 3662.9,2397.46 3479.98,2580.39 cw(c3487.05,2587.46) 3477.05,2587.46 3477.05,2625.64 ccw(c3467.05,2625.64) 3474.12,2632.71 3386.94,2719.89 ccw(c3375.98,2708.93) 3386.49,2720.33 3268.54,2829.05 ccw(c3261.76,2821.69) 3261.76,2831.69 v1(3169.29,2831.69)
  B.Cu w5: 1496.31,2942.39 1496.31,2950.33
  B.Cu w6: 1496.31,2942.39 1496.31,2916.14 ccw(c1508.31,2916.14) 1499.79,2907.69 1572.31,2835.17 ccw(c1580.76,2843.69) 1580.76,2831.69 v1(3169.29,2831.69) ; 1496.31,2950.33 1496.31,2977.56 cw(c1508.31,2977.56) 1499.8,2986.02 R1052_4_CH1.1@1521.65,3007.87
  B.Cu w10: TP1018_4_CH1.1@1490.87,3063.27 1490.96,3063.21 cw(c1480.95,3045.9) 1495.08,3060.06 1516.89,3038.25 ccw(c1530.96,3052.45) v1(1521.05,3035.08) ; v1@1520,3034.09 v1(1521.05,3035.08) ; R1052_4_CH1.1@1521.65,3007.87 1521.35,3014.68 1521.35,3025.71 ccw(c1501.35,3025.65) 1521.34,3026.31 v1(1521.05,3035.08)
DC_CPL_2: R1052_4_CH2.1 TP1018_4_CH2.1 U18.M15 U1001_4_CH2.9 U1001_4_CH2.10 U1001_4_CH2.11 | length 4580.8
  F.Cu w6: U1001_4_CH2.9@1479.33,2261.81 1479.33,2236.22 1487.04,2228.51 1494.09,2228.51 ; U1001_4_CH2.10@1499.02,2261.81 1499.02,2233.43 ; U1001_4_CH2.11@1518.7,2261.81 1518.37,2261.48 1518.37,2230.88 v1(1518.03,2230.55) 1516.12,2228.63 1507.62,2228.63 1507.5,2228.51 1503.94,2228.51 ; U18.M15@3069.09,1485.65 v1(3084.06,1500.62) ; 1494.09,2228.51 1499.02,2228.51 ; 1494.09,2228.51 1499.02,2233.43 ; 1499.02,2228.51 1499.02,2233.43 ; 1499.02,2228.51 1503.94,2228.51 ; 1499.02,2233.43 1503.94,2228.51
  In3.Cu (Sign) w5: v1(3084.06,1500.62) 3071.02,1513.66 ccw(c3063.96,1506.58) 3063.96,1516.58 3050.27,1516.58 cw(c3050.27,1526.58) 3043.21,1519.49 3039.92,1522.78 cw(c3047.02,1529.82) 3037.02,1529.82 3037.02,1535.53 ccw(c3027.02,1535.53) 3034.13,1542.56 3018.48,1558.21 cw(c3025.57,1565.27) 3015.57,1565.27 3015.57,1573.15 ccw(c3005.57,1573.15) 3012.67,1580.19 3000.83,1592.03 cw(c3007.91,1599.09) 2997.91,1599.09 2997.91,1621.77 cw(c3007.91,1621.77) 3000.82,1628.82 3039.14,1667.14 cw(c3046.18,1660.04) 3046.18,1670.04 3717.31,1670.04 ccw(c3717.31,1680.04) 3724.36,1672.95 3803.07,1751.66 ccw(c3795.98,1758.71) 3805.98,1758.71 3805.98,2084.46 ccw(c3795.98,2084.46) 3803.07,2091.51 3263.64,2630.95 ccw(c3256.58,2623.86) 3256.58,2633.86 v1(3169.29,2633.86)
  B.Cu w5: R1052_4_CH2.1@1521.65,2200.79 1499.22,2178.36 ccw(c1506.31,2171.3) 1496.31,2171.3 1496.31,2102.32 ccw(c1506.31,2102.32) 1499.21,2095.28 1538.43,2056.06 ccw(c1545.48,2063.15) 1545.48,2053.15 1672.88,2053.15 ccw(c1672.88,2063.15) 1679.95,2056.08 1739.89,2116.02 1891.54,2267.67 cw(c1898.58,2260.57) 1898.58,2270.57 2016.01,2270.57 ccw(c2016.01,2280.57) 2023.07,2273.49 2105.32,2355.73 ccw(c2098.23,2362.79) 2108.23,2362.79 2108.23,2466.33 cw(c2118.23,2466.33) 2111.14,2473.39 2221.47,2583.72 cw(c2228.51,2576.61) 2228.51,2586.61 3115.98,2586.61 ccw(c3115.94,2596.61) 3123,2589.53 3130.95,2597.48 ccw(c3123.86,2604.54) 3133.86,2604.54 3133.86,2618.69 cw(c3143.86,2618.69) 3136.77,2625.75 3141.98,2630.96 cw(c3149.02,2623.86) 3149.02,2633.86 v1(3169.29,2633.86)
  B.Cu w10: TP1018_4_CH2.1@1490.87,2256.18 1490.96,2256.12 cw(c1480.38,2239.15) 1494.5,2253.31 v1@1513.32,2234.49 ; v1@1513.34,2234.48 1514.45,2233.37 ccw(c1528.52,2247.57) v1(1518.03,2230.55) ; v1@1517.86,2230.37 v1(1518.03,2230.55) ; R1052_4_CH2.1@1521.65,2200.79 1519.18,2207.6 1519.18,2223.22 ccw(c1499.18,2223.22) 1518.7,2227.59 v1(1518.03,2230.55)
DC_CPL_3: R1052_4_CH3.1 TP1018_4_CH3.1 U18.N18 U1001_4_CH3.9 U1001_4_CH3.10 U1001_4_CH3.11 | length 2685.2
  F.Cu w6: U1001_4_CH3.9@1479.33,1454.72 1479.33,1429.13 1487.04,1421.43 1494.09,1421.43 ; U1001_4_CH3.10@1499.02,1454.72 1499.02,1427.17 ; U1001_4_CH3.11@1518.7,1454.72 1519.35,1454.07 1519.35,1424.74 v1(1520,1424.09) 1517.41,1421.51 1504.68,1421.51 ; U18.N18@3100.59,1580.14 3111.73,1591.28 ccw(c3103.21,1599.74) 3115.2,1599.26 v1(3115.95,1618.11) ; 1494.09,1421.43 1499.02,1426.35 ; 1494.09,1421.43 1499.02,1421.43 1499.02,1421.51 ; 1499.02,1421.51 1499.02,1426.35 ; 1499.02,1421.51 1504.68,1421.51 ; 1499.02,1426.35 1499.02,1427.17 ; 1499.02,1427.17 1504.68,1421.51
  B.Cu w5: R1052_4_CH3.1@1521.65,1393.7 1499.22,1371.27 ccw(c1506.31,1364.22) 1496.31,1364.22 1496.31,1224.37 ccw(c1506.31,1224.37) 1499.21,1217.33 1536.46,1180.08 ccw(c1543.51,1187.17) 1543.51,1177.17 1752.75,1177.17 ccw(c1752.75,1187.17) 1759.8,1180.08 2099.93,1520.21 ccw(c2092.85,1527.27) 2102.85,1527.27 2102.85,1607.56 cw(c2112.85,1607.56) 2105.76,1614.62 2429.19,1938.05 cw(c2436.23,1930.94) 2436.23,1940.94 2941.72,1940.94 cw(c2941.72,1930.94) 2948.78,1938.03 3048.27,1838.54 cw(c3041.18,1831.49) 3051.18,1831.49 3051.18,1667 ccw(c3061.18,1667) 3054.08,1659.96 3093.02,1621.02 ccw(c3100.08,1628.11) 3100.08,1618.11 v1(3115.95,1618.11)
  B.Cu w10: TP1018_4_CH3.1@1490.87,1449.09 1490.96,1449.01 cw(c1478.27,1433.56) 1492.4,1447.71 1509.69,1430.42 ccw(c1523.77,1444.63) 1514.67,1426.82 v1(1520,1424.09) ; v1@1518.09,1422.18 v1(1520,1424.09) ; R1052_4_CH3.1@1521.65,1393.7 1520.83,1400.51 1520.83,1401.16 ccw(c1500.83,1401.16) 1520.83,1401.36 1520.72,1412.13 ccw(c1500.72,1411.94) 1520.66,1413.43 1520.04,1422.1 cw(c1539.99,1423.53) v1(1520,1424.09)
DC_CPL_4: R1052_4_CH4.1 TP1018_4_CH4.1 U18.V12 U1001_4_CH4.9 U1001_4_CH4.10 U1001_4_CH4.11 | length 2923.6
  F.Cu w6: U1001_4_CH4.9@1479.33,647.64 1479.33,622.05 1487.04,614.34 1494.09,614.34 ; U1001_4_CH4.10@1499.02,647.64 1499.02,619.26 ; U1001_4_CH4.11@1518.7,647.64 1519.35,646.99 1519.35,614.74 v1@1519.76,614.34 ; v1@1520,614.09 v1@1519.76,614.34 ; U18.V12@3257.93,1391.1 3272.93,1406.1 v1(3273.68,1406.1) ; 1494.09,614.34 1499.02,614.34 ; 1494.09,614.34 1499.02,619.26 ; 1499.02,614.34 1499.02,619.26 ; 1499.02,614.34 1503.94,614.34 ; 1499.02,619.26 1503.94,614.34 ; 1503.94,614.34 v1@1519.76,614.34
  B.Cu w5: R1052_4_CH4.1@1518.7,583.66 1518.7,465.76 ccw(c1528.7,465.76) 1521.6,458.72 1538.43,441.89 ccw(c1545.48,448.98) 1545.48,438.98 1673.81,438.98 ccw(c1673.81,448.98) 1680.87,441.89 1734.88,495.91 ccw(c1727.8,502.96) 1737.8,502.96 1737.8,598.52 cw(c1747.8,598.52) 1740.71,605.57 1843.5,708.36 cw(c1850.54,701.26) 1850.54,711.26 2024.3,711.26 ccw(c2024.3,721.26) 2031.36,714.18 2076.73,759.55 ccw(c2069.64,766.61) 2079.64,766.61 2079.64,887.5 cw(c2089.64,887.5) 2082.56,894.56 2121.77,933.77 cw(c2128.81,926.67) 2128.81,936.67 2386.91,936.67 ccw(c2386.91,946.67) 2393.96,939.58 2416.05,961.67 cw(c2423.09,954.57) 2423.09,964.57 2943.95,964.57 ccw(c2943.95,974.57) 2951.01,967.48 2970.94,987.42 cw(c2977.98,980.31) 2977.98,990.31 3267.39,990.31 ccw(c3267.39,1000.31) 3274.44,993.23 3298.1,1016.89 ccw(c3291.02,1023.94) 3301.02,1023.94 3301.02,1374.62 ccw(c3291.02,1374.62) 3298.09,1381.7 v1(3273.68,1406.1)
  B.Cu w10: TP1018_4_CH4.1@1490.87,642.01 1492.48,642.01 1518.39,616.09 v1(1520,616.09) 1520.83,615.27 1520.83,587.44 R1052_4_CH4.1@1521.65,586.61
DC_FB_CH1: C1035_4_CH1.2 R1041_4_CH1.2 R1042_4_CH1.2 R1044_4_CH1.1 U1001_4_CH1.15 U1011_4_CH1.4 | length 656.6
  F.Cu w6: R1041_4_CH1.2@1623.03,3352.36 1623.03,3350.39 R1042_4_CH1.2@1660.43,3312.99 1687.46,3285.97 1687.46,3124.07 C1035_4_CH1.2@1667.32,3103.94 ; R1042_4_CH1.2@1657.48,3314.96 R1042_4_CH1.2@1657.97,3315.45 ; C1035_4_CH1.2@1660.43,3103.94 1604.9,3103.94 1597.44,3096.48 1597.44,2977.36 1585.63,2965.55 1585.63,2895.67 1609.74,2871.56 U1011_4_CH1.4@1618.11,2871.56 1625.49,2871.56 1649.61,2895.67 R1044_4_CH1.1@1666.34,2895.67
DC_FB_CH2: C1035_4_CH2.2 R1041_4_CH2.2 R1042_4_CH2.2 R1044_4_CH2.1 U1001_4_CH2.15 U1011_4_CH2.4 | length 656.5
  F.Cu w6: R1041_4_CH2.2@1623.03,2545.28 1623.03,2543.31 R1042_4_CH2.2@1660.43,2505.91 1687.46,2478.88 1687.46,2316.99 C1035_4_CH2.2@1667.32,2296.85 ; R1042_4_CH2.2@1657.48,2507.87 R1042_4_CH2.2@1657.97,2508.37 ; C1035_4_CH2.2@1660.43,2296.85 1605.03,2296.85 1597.44,2289.26 1597.44,2170.28 1585.63,2158.46 1585.63,2088.58 1609.74,2064.47 U1011_4_CH2.4@1618.11,2064.47 1625.49,2064.47 1649.61,2088.58 R1044_4_CH2.1@1666.34,2088.58
DC_FB_CH3: C1035_4_CH3.2 R1041_4_CH3.2 R1042_4_CH3.2 R1044_4_CH3.1 U1001_4_CH3.15 U1011_4_CH3.4 | length 657
  F.Cu w6: R1041_4_CH3.2@1623.03,1738.19 1623.03,1736.22 R1042_4_CH3.2@1660.43,1698.82 1687.46,1671.79 1687.46,1509.9 C1035_4_CH3.2@1667.32,1489.76 ; R1042_4_CH3.2@1657.48,1700.79 R1042_4_CH3.2@1657.97,1701.28 ; C1035_4_CH3.2@1660.43,1489.76 1604.33,1489.76 1597.44,1482.88 1597.44,1363.19 1585.63,1351.38 1585.63,1281.5 1609.74,1257.38 U1011_4_CH3.4@1618.11,1257.38 1625.49,1257.38 1649.61,1281.5 R1044_4_CH3.1@1666.34,1281.5
DC_FB_CH4: C1035_4_CH4.2 R1041_4_CH4.2 R1042_4_CH4.2 R1044_4_CH4.1 U1001_4_CH4.15 U1011_4_CH4.4 | length 657.5
  F.Cu w6: R1041_4_CH4.2@1623.03,931.1 1623.03,929.13 R1042_4_CH4.2@1660.43,891.73 1687.46,864.71 1687.46,702.82 C1035_4_CH4.2@1667.32,682.68 ; R1042_4_CH4.2@1657.48,893.7 R1042_4_CH4.2@1657.97,894.19 ; C1035_4_CH4.2@1660.43,682.68 1603.37,682.68 1597.44,676.75 1597.44,556.1 1585.63,544.29 1585.63,474.41 1609.74,450.3 U1011_4_CH4.4@1618.11,450.3 1625.49,450.3 1649.61,474.41 R1044_4_CH4.1@1666.34,474.41
DC_FB_TRIM_CH1: R1044_4_CH1.2 R1048_4_CH1.2 R1049_4_CH1.1 R1049_4_CH1.2 | length 545.7
  F.Cu w6: R1049_4_CH1.2@1379.92,2896.65 R1049_4_CH1.2@1364.17,2880.91 ; R1048_4_CH1.2@1413.39,3061.02 1413.39,3018.7 R1049_4_CH1.1@1403.54,3008.86 1364.17,2969.49 R1049_4_CH1.2@1364.17,2880.91 ; R1044_4_CH1.2@1666.34,2860.24 1651.58,2845.47 1399.61,2845.47 R1049_4_CH1.2@1364.17,2880.91
DC_FB_TRIM_CH2: R1044_4_CH2.2 R1048_4_CH2.2 R1049_4_CH2.1 R1049_4_CH2.2 | length 545.7
  F.Cu w6: R1049_4_CH2.2@1379.92,2089.57 R1049_4_CH2.2@1364.17,2073.82 ; R1048_4_CH2.2@1413.39,2253.94 1413.39,2211.61 R1049_4_CH2.1@1403.54,2201.77 1364.17,2162.4 R1049_4_CH2.2@1364.17,2073.82 ; R1044_4_CH2.2@1666.34,2053.15 1651.58,2038.39 1399.61,2038.39 R1049_4_CH2.2@1364.17,2073.82
DC_FB_TRIM_CH3: R1044_4_CH3.2 R1048_4_CH3.2 R1049_4_CH3.1 R1049_4_CH3.2 | length 545.7
  F.Cu w6: R1049_4_CH3.2@1379.92,1282.48 R1049_4_CH3.2@1364.17,1266.73 ; R1048_4_CH3.2@1413.39,1446.85 1413.39,1404.53 R1049_4_CH3.1@1403.54,1394.69 1364.17,1355.31 R1049_4_CH3.2@1364.17,1266.73 ; R1044_4_CH3.2@1666.34,1246.06 1651.58,1231.3 1399.61,1231.3 R1049_4_CH3.2@1364.17,1266.73
DC_FB_TRIM_CH4: R1044_4_CH4.2 R1048_4_CH4.2 R1049_4_CH4.1 R1049_4_CH4.2 | length 545.7
  F.Cu w6: R1049_4_CH4.2@1379.92,475.39 R1049_4_CH4.2@1364.17,459.65 ; R1048_4_CH4.2@1413.39,639.76 1413.39,597.44 R1049_4_CH4.1@1403.54,587.6 1364.17,548.23 R1049_4_CH4.2@1364.17,459.65 ; R1044_4_CH4.2@1666.34,438.98 1651.58,424.21 1399.61,424.21 R1049_4_CH4.2@1364.17,459.65
DONE: TP44.1 U18.F12 | length 692.6
  F.Cu w6: v1(2864.23,1406.16) 2864.92,1406.16 U18.F12@2879.98,1391.1
  F.Cu w10: U18.F12@2879.98,1391.1 U18.F12@2880.03,1390.97
  In3.Cu (Sign) w5: v1(2864.23,1406.16) cw(c2873.54,1402.51) 2866.45,1409.57 2876.87,1419.99 cw(c2883.91,1412.88) 2883.91,1422.88 3125.65,1422.88 cw(c3125.65,1412.88) 3132.71,1419.97 3160.92,1391.75 cw(c3153.84,1384.7) 3163.84,1384.7 3163.84,1340.3 ccw(c3173.84,1340.3) 3166.75,1333.25 3184.61,1315.38 ccw(c3191.67,1322.46) 3191.67,1312.46 3304.58,1312.46 ccw(c3304.58,1322.46) 3311.63,1315.38 v1@3329.78,1333.53
  B.Cu w10: v1(3329.72,1333.66) 3329.86,1333.53 3439.11,1333.53 TP44.1@3442.91,1329.72
FCLK_N: U6.20 U18.B12 | length 1132.7
  F.Cu w4.7: U6.20@2713.31,2035.43 2713.31,2021.25 2709.82,2017.75 2709.82,1956.6 2702.38,1949.16 2671.93,1918.71 2628.71,1918.71 2559.99,1849.99 2559.99,1742.5 2559.99,1656.16 ccw(c2564.84,1656.16) 2564.84,1651.31 cw(c2564.84,1633.76) 2582.39,1633.76 cw(c2564.84,1633.76) 2564.84,1616.21 2553.3,1616.21 ccw(c2553.3,1611.36) 2548.45,1611.36 ccw(c2553.3,1611.36) 2553.3,1606.51 2572.16,1606.51 cw(c2572.16,1588.96) 2589.71,1588.96 cw(c2572.16,1588.96) 2572.16,1571.41 2544,1571.41 ccw(c2544,1566.56) 2539.15,1566.56 ccw(c2544,1566.56) 2544,1561.71 2572.16,1561.71 cw(c2572.16,1544.16) 2589.71,1544.16 cw(c2572.16,1544.16) 2572.16,1526.61 2544,1526.61 ccw(c2544,1521.76) 2539.15,1521.76 ccw(c2544,1521.76) 2544,1516.91 2572.16,1516.91 cw(c2572.16,1499.36) 2589.71,1499.36 cw(c2572.16,1499.36) 2572.16,1481.81 2564.84,1481.81 ccw(c2564.84,1476.96) 2559.99,1476.96 2559.99,1471.41 2579.94,1451.46 2622.63,1408.77 2734.25,1408.77 2751.79,1391.24 U18.B12@2753.94,1391.24
FCLK_P: U6.19 U18.A12 | length 1126.1
  F.Cu w4.7: U6.19@2693.62,2035.43 2693.62,2021.25 2697.12,2017.75 2697.12,2002.2 2697.12,1999.77 2692.52,1999.77 2692.52,1990.07 2697.12,1990.07 2697.12,1987.72 2697.12,1961.86 2666.67,1931.41 2623.45,1931.41 2547.29,1855.25 2547.29,1742.5 2547.29,1656.16 ccw(c2564.84,1656.16) 2564.84,1638.61 cw(c2564.84,1633.76) 2569.69,1633.76 cw(c2564.84,1633.76) 2564.84,1628.91 2553.3,1628.91 ccw(c2553.3,1611.36) 2535.75,1611.36 ccw(c2553.3,1611.36) 2553.3,1593.81 2572.16,1593.81 cw(c2572.16,1588.96) 2577.01,1588.96 cw(c2572.16,1588.96) 2572.16,1584.11 2544,1584.11 ccw(c2544,1566.56) 2526.45,1566.56 ccw(c2544,1566.56) 2544,1549.01 2572.16,1549.01 cw(c2572.16,1544.16) 2577.01,1544.16 cw(c2572.16,1544.16) 2572.16,1539.31 2544,1539.31 ccw(c2544,1521.76) 2526.45,1521.76 ccw(c2544,1521.76) 2544,1504.21 2572.16,1504.21 cw(c2572.16,1499.36) 2577.01,1499.36 cw(c2572.16,1499.36) 2572.16,1494.51 2564.84,1494.51 ccw(c2564.84,1476.96) 2547.29,1476.96 2547.29,1466.15 2561.98,1451.46 2617.37,1396.07 2715.15,1396.07 2719.98,1391.24 U18.A12@2722.44,1391.24
FE_EN: R111.1 TP4.1 U13.6 U15.7 U18.U15 | length 3393.1
  F.Cu w6: U13.6@3196.06,3371.46 3209.15,3371.46 3222.34,3358.27 v1(3255.91,3358.27) ; U18.U15@3226.49,1485.46 v1(3241.46,1470.49)
  F.Cu w10: v1(3531.5,3310.04) 3531.69,3309.84 U15.7@3531.69,3284.45
  B.Cu w5: v1(3241.46,1470.49) 3253,1458.95 ccw(c3260.03,1466.06) 3260.03,1456.06 3307.52,1456.06 cw(c3307.52,1446.06) 3314.59,1453.13 3371.13,1396.59 ccw(c3378.16,1403.7) 3378.16,1393.7 3484.05,1393.7 ccw(c3484.05,1403.7) 3491.1,1396.61 3536.04,1441.56 cw(c3543.08,1434.45) 3543.08,1444.45 3559.71,1444.45 ccw(c3559.71,1454.45) 3566.77,1447.37 3590.11,1470.72 cw(c3597.15,1463.61) 3597.15,1473.61 3947.48,1473.61 ccw(c3947.48,1483.61) 3954.53,1476.53 4004.55,1526.54 ccw(c3997.46,1533.6) 4007.46,1533.6 4007.46,2331.27 ccw(c3997.46,2331.27) 4004.55,2338.32 3865.44,2477.43 ccw(c3858.38,2470.35) 3858.38,2480.35 3740.16,2480.35 cw(c3740.16,2490.35) 3733.1,2483.26 3698.1,2518.26 cw(c3705.21,2525.3) 3695.21,2525.3 3695.21,2838.21 cw(c3705.21,2838.21) 3698.12,2845.27 3726.9,2874.05 ccw(c3719.82,2881.11) 3729.82,2881.11 3729.82,3138.35 ccw(c3719.82,3138.35) 3726.9,3145.4 3637.46,3234.85 ccw(c3630.41,3227.76) 3630.41,3237.76 3607.92,3237.76 cw(c3607.92,3247.76) 3600.86,3240.67 v1(3531.5,3310.04)
  B.Cu w10: TP4.1@3255.91,3399.02 v1(3255.91,3358.27) 3261.43,3353.93 cw(c3249.06,3338.21) 3263.16,3352.39 3292.8,3322.76 ccw(c3306.91,3336.93) 3306.91,3316.93 3481.3,3316.93 3488.11,3310.04 v1@3532.48,3310.04
FE_PG: R58.2 TP23.1 U15.5 U18.V16 | length 2820.4
  F.Cu w5: U18.V16@3257.87,1517.22 v1(3270.08,1531.77)
  F.Cu w10: v1(3551.18,3172.44) 3551.38,3172.64 U15.5@3551.38,3193.9
  B.Cu w5: v1@3266.08,1531.77 v1@3268.08,1529.77 ; v1(3270.08,1531.77) 3291.03,1510.83 cw(c3283.95,1503.76) 3293.95,1503.76 3293.95,1492.93 ccw(c3303.95,1492.98) 3296.85,1485.94 3318.25,1464.54 3374.41,1408.38 ccw(c3381.44,1415.49) 3381.44,1405.49 3474.19,1405.49 ccw(c3474.19,1415.49) 3481.24,1408.41 R58.2@3553.13,1480.3 ; v1(3551.18,3172.44) 3578.42,3172.44 cw(c3578.42,3162.44) 3585.47,3169.53 3608.56,3146.44 cw(c3601.47,3139.39) 3611.47,3139.39 3611.47,2912.67 ccw(c3621.47,2912.67) 3614.38,2905.62 3673.26,2846.74 cw(c3666.17,2839.69) 3676.17,2839.69 3676.17,2518.36 ccw(c3686.17,2518.36) 3679.06,2511.32 3723.33,2467.05 ccw(c3730.36,2474.16) 3730.36,2464.16 3846.11,2464.16 cw(c3846.11,2454.16) 3853.17,2461.25 3990.71,2323.71 cw(c3983.62,2316.65) 3993.62,2316.65 3993.62,1547.96 cw(c3983.62,1547.96) 3990.71,1540.9 3940.23,1490.42 cw(c3933.17,1497.51) 3933.17,1487.51 3563.98,1487.51 R58.2@3555.12,1482.28
  B.Cu w10: TP23.1@3511.81,3172.44 v1(3551.18,3172.44)
FPGA_EN: R117.1 TP81.1 U20.4 | length 136.7
  F.Cu w10: v1(3364.37,1225.39) 3364.37,1214.37 3373.03,1205.71 U20.4@3394.64,1205.71
  B.Cu w10: v1(3364.37,1225.39) 3388.78,1249.8 R117.1@3388.78,1252.95 TP81.1@3442.91,1252.95